# Altium PCB module-BGA_RG-4layers_v2.1.PcbDoc (part 2 of 3)
Units mm, origin at the board's own origin, x right, y up, seen from the top; angles counter-clockwise.
Board outline 20 x 20 mm, 4 copper layers (Top Layer, Signal Layer 1, Signal Layer 2, Bottom Layer), stack 1.546 mm thick; 75 components, 77 nets, 282 pads, 367 vias.
Unrouted connection lines stored in the file: 143.
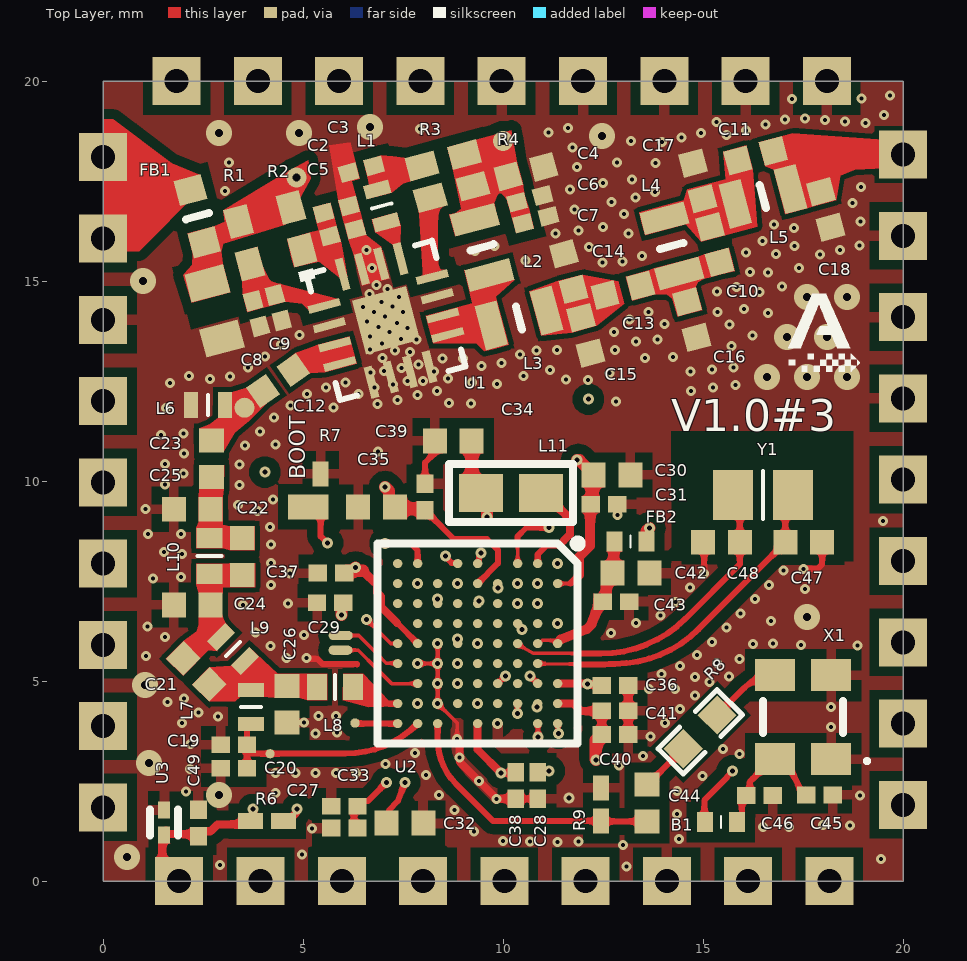
[diagram p0: Top Layer view]

## Part data (continued)
L4 L5: library part LQW18AN10NG80D, "Inductor Wirewound , 10 nH, 52 Milliohm, ± 2%, 4.75 GHz, 1.6 A, 0603 [1608 Metric]", Case Code (Imperial)=0603, Case Code (Metric)=1608, Current Rating=1.6A, DC Resistance (DCR)=52mR, Manufacturer 1=Murata, Max Operating Temperature=125°C, Min Operating Temperature=-55°C, Package Quantity=4000, Self Resonant Frequency=4.75GHz, Supplier Part Number 1=490-17899-1-ND, Test Frequency=100MHz, TOLERANCE=2%, Case/Package=0603, Category 1="Fixed Inductors", ComponentLink1Description=http://www.mouser.com/ds/2/281/murata_inductors-1115352.pdf?src-supplier=Mouser, ComponentLink1URL=http://www.mouser.com/ds/2/281/murata_inductors-1115352.pdf?src-supplier=Mouser, ComponentLink2Description=https://search.murata.co.jp/Ceramy/image/img/P02/JELF243A-0102.pdf?src-supplier=Digi-Key, ComponentLink2URL=https://search.murata.co.jp/Ceramy/image/img/P02/JELF243A-0102.pdf?src-supplier=Digi-Key, ComponentLink3Description=http://www.murata.com/~/media/webrenewal/support/library/catalog/products/inductor/chip/o05e.ashx?src-supplier=Digi-Key, ComponentLink3URL=http://www.murata.com/~/media/webrenewal/support/library/catalog/products/inductor/chip/o05e.ashx?src-supplier=Digi-Key, ComponentLink4Description=https://datasheet.octopart.com/LQW18AN10NG80D-Murata-datasheet-142542380.pdf?src-supplier=Ciiva+Crawler, ComponentLink4URL=https://datasheet.octopart.com/LQW18AN10NG80D-Murata-datasheet-142542380.pdf?src-supplier=Ciiva+Crawler, ComponentLink5Description=https://datasheet.octopart.com/LQW18AN10NG80D-Murata-datasheet-141294525.pdf?src-supplier=Ciiva+Crawler, ComponentLink5URL=https://datasheet.octopart.com/LQW18AN10NG80D-Murata-datasheet-141294525.pdf?src-supplier=Ciiva+Crawler, ComponentLink6Description=https://datasheet.octopart.com/LQW18AN10NG80D-Murata-datasheet-140717668.pdf?src-supplier=Ciiva+Crawler, ComponentLink6URL=https://datasheet.octopart.com/LQW18AN10NG80D-Murata-datasheet-140717668.pdf?src-supplier=Ciiva+Crawler, ComponentLink7Description=https://datasheet.octopart.com/LQW18AN10NG80D-Murata-datasheet-138758702.pdf?src-supplier=Ciiva+Crawler, ComponentLink7URL=https://datasheet.octopart.com/LQW18AN10NG80D-Murata-datasheet-138758702.pdf?src-supplier=Ciiva+Crawler, ComponentLink8Description=https://datasheet.octopart.com/LQW18AN10NG80D-Murata-datasheet-145452284.pdf?src-supplier=Geoflip, ComponentLink8URL=https://datasheet.octopart.com/LQW18AN10NG80D-Murata-datasheet-145452284.pdf?src-supplier=Geoflip, ComponentLink9Description=https://datasheet.octopart.com/LQW18AN10NG80D-Murata-datasheet-142046197.pdf?src-supplier=Arrow.cn, ComponentLink9URL=https://datasheet.octopart.com/LQW18AN10NG80D-Murata-datasheet-142046197.pdf?src-supplier=Arrow.cn, ComponentLink10Description=https://datasheet.octopart.com/LQW18AN10NG80D-Murata-datasheet-141404629.pdf?src-supplier=TME, ComponentLink10URL=https://datasheet.octopart.com/LQW18AN10NG80D-Murata-datasheet-141404629.pdf?src-supplier=TME, Core Material=Ferrite, Description 1="Wirewound Inductor, 10 nH, 52 Milliohm, ± 2%, 4.75 GHz, 1.6 A, 0603 [1608 Metric]", Height=0.9mm, Height - Seated (Max)=0.039inch, Inductance=10nH, Length=0.065inch, Manufacturer Part Number 1=LQW18AN10NG80D, Max DC Current=1.6A, Mount="Surface Mount", Packaging="Tape and Reel", Pricing 1="1=0,21, 10=0,191, 25=0,1696, 50=0,1442, 100=0,1273, 250=0,11664, 500=0,10604, 1000=0,08908 (USD)", Q Factor=38, RoHS Compliant=Yes, Series=LQW18, Shielding=Unshielded, Stock 1=25557, Supplier 1=Digi-Key, Termination=SMD/SMT, Weight=7.1E-05oz, Width=0.99mm
L7: "Inductor RF Chip Multi-Layer 68nH 5% 100MHz 8Q-Factor Air 180mA 1.25Ohm DCR 0402 Paper T/R", Case Code (Imperial)=0402, Case Code (Metric)=1005, Current Rating=180mA, DC Resistance (DCR)=1.25R, Inductance=68nH, Inductance Tolerance=5%, Inductor Type=MONOLITHIC, Manufacturer 1=Murata, Max Operating Temperature=125°C, Min Operating Temperature=-55°C, Package Quantity=1, Self Resonant Frequency=800MHz, Supplier Part Number 1=490-1095-1-ND, Test Frequency=100MHz, Case/Package=0402, Category 1="Fixed Inductors", ComponentLink1Description=https://datasheet.ciiva.com/11801/0900766b80f10808-11801435.pdf?src-supplier=Rs, ComponentLink1URL=https://datasheet.ciiva.com/11801/0900766b80f10808-11801435.pdf?src-supplier=Rs, ComponentLink2Description=https://datasheet.ciiva.com/8002/66026-8002542.pdf?src-supplier=Element14, ComponentLink2URL=https://datasheet.ciiva.com/8002/66026-8002542.pdf?src-supplier=Element14, ComponentLink3Description=https://datasheet.ciiva.com/29696/l0075s0083lqg15hn-29696694.pdf?src-supplier=Digi-Key, ComponentLink3URL=https://datasheet.ciiva.com/29696/l0075s0083lqg15hn-29696694.pdf?src-supplier=Digi-Key, ComponentLink4Description=https://datasheet.ciiva.com/6705/l0075s0083lqg15hn-6705208.pdf?src-supplier=Digi-Key, ComponentLink4URL=https://datasheet.ciiva.com/6705/l0075s0083lqg15hn-6705208.pdf?src-supplier=Digi-Key, ComponentLink5Description=https://datasheet.ciiva.com/29696/l0075s0083lqg15hn-29696695.pdf?src-supplier=Digi-Key, ComponentLink5URL=https://datasheet.ciiva.com/29696/l0075s0083lqg15hn-29696695.pdf?src-supplier=Digi-Key, ComponentLink6Description=https://datasheet.ciiva.com/8510/l0075s0083lqg15hn-8510777.pdf?src-supplier=Avnet, ComponentLink6URL=https://datasheet.ciiva.com/8510/l0075s0083lqg15hn-8510777.pdf?src-supplier=Avnet, Core Material=Air, DC Current=180mA, Depth=0.55mm, Description 1="Inductor RF Chip Multi-Layer 68nH 5% 100MHz 8Q-Factor Air 180mA 1.25Ohm DCR 0402 Paper T/R", Height=0.5mm, Height - Seated (Max)=0.022inch, Lead Free="Lead Free", Length=0.039inch, Manufacturer Part Number 1=LQG15HN68NJ02D, Max DC Current=180mA, Military Standard=Not, Mount="Surface Mount", Number of Pins=2, Packaging="Tape and Reel", Q Factor=8, Reach SVHC Compliant=No, RoHS 1=Yes, RoHS Compliant=Yes, Series=LQG15HS, Shielding=Unshielded, Supplier 1=Digi-Key, Termination=SMD/SMT, TOLERANCE=5%, Width=0.02inch
L8: "Inductor RF Chip Multi-Layer 11nH 5% 0402 Paper T/R", Case Code (Imperial)=0402, Case Code (Metric)=1005, Current Rating=450mA, DC Resistance (DCR)=220mR, Inductance=10nH, Manufacturer 1=Murata, Max Operating Temperature=125°C, Min Operating Temperature=-55°C, Ratings=AEC-Q200, Self Resonant Frequency=3GHz, Supplier Part Number 1=490-15246-1-ND, Test Frequency=100MHz, TOLERANCE=5%, Case/Package=0402, Category 1="Fixed Inductors", ComponentLink1Description=http://search.murata.co.jp/Ceramy/image/img/P02/JELF243B-9117.pdf?src-supplier=Digi-Key, ComponentLink1URL=http://search.murata.co.jp/Ceramy/image/img/P02/JELF243B-9117.pdf?src-supplier=Digi-Key, Core Material=Air, Description 1="Ind Chip Multi-Layer 11nH 5% 0402 Paper T/R", Manufacturer Part Number 1=LQG15WZ11NJ02D, Mount="Surface Mount", Packaging="Cut Tape", RoHS 1=Yes, RoHS Compliant=Yes, Series=LQG15, Shielding=Unshielded, Supplier 1=Digi-Key
L10: "Inductor RF Chip, Aec-Q200, 20Nh, 0402, 2.1Ghz Rohs Compliant: Yes", Case/Package=0402, DC Resistance (DCR)=1.1R, Inductance=20nH, Manufacturer 1=Murata, Max Operating Temperature=125°C, Min Operating Temperature=-55°C, Ratings=AEC-Q200, Self Resonant Frequency=2.1GHz, Supplier Part Number 1=81-LQG15WH20NJ02D, Test Frequency=100MHz, TOLERANCE=5%, Category 1="Fixed Inductors", Description 1="Inductor, Aec-Q200, 20Nh, 0402, 2.1Ghz Rohs Compliant: Yes", Manufacturer Part Number 1=LQG15WH20NJ02D, Mount="Surface Mount", Pricing 1="1=0,14, 10=0,097, 50=0,097, 100=0,078, 1000=0,06, 10000=0,045 (USD)", RoHS 1=Yes, RoHS Compliant=Yes, Series=LQG15, Shielding=Unshielded, Stock 1=9495, Supplier 1=Mouser
L11: "Inductor RF Shielded 15µH, ±5%", Case/Package=0603, DC Resistance (DCR)=1.5R, Inductance=15uH, Manufacturer=TDK, Manufacturer_Part_Number=MLZ2012M150W, Max Operating Temperature=125°C, Min Operating Temperature=-55°C, Saturation Current=70mA, Supplier Part Number 1=810-MLZ1608M150WT000, Test Frequency=2MHz, TOLERANCE=20%, Category 1="Fixed Inductors", Core Material=Ferrite, Description 1="Inductors For Decoupling Circuits, Multilayer Ferrite", Manufacturer 1=TDK, Manufacturer Part Number 1=MLZ1608M150WT000, Mount="Surface Mount", Pricing 1="1=0,15, 10=0,103, 50=0,103, 100=0,084, 1000=0,063, 10000=0,051 (USD)", RoHS 1=Yes, RoHS Compliant=Yes, Series=MLZ, Shielding=Shielded, Stock 1=10538, Supplier 1=Mouser
R1: library part RC0402FR-132K4L, "Thick Film Resistors - SMD 2.4 kOhms 62.5 mW 0402 1%", Case/Package=0402, Manufacturer 1=Yageo, Max Operating Temperature=155°C, Min Operating Temperature=-55°C, Resistance=2.4kR, Supplier Part Number 1=603-RC0402FR-132K4L, Temperature Coefficient=100ppm/°C, TOLERANCE=1%, Category 1="Chip SMD Resistors", ComponentLink1Description=https://datasheet.ciiva.com/8894/pyu-rc0402-51-rohs-l-6-8894383.pdf?src-supplier=Avnet, ComponentLink1URL=https://datasheet.ciiva.com/8894/pyu-rc0402-51-rohs-l-6-8894383.pdf?src-supplier=Avnet, Contact Plating=Tin,Matte, Description 1="Res Thick Film 0402 2.4K Ohm 1% 1/16W ±100ppm/°C Molded SMD SMD Paper T/R", Manufacturer Part Number 1=RC0402FR-132K4L, Pricing 1="1=0,1, 10=0,014, 50=0,014, 100=0,007, 1000=0,004, 10000=0,003 (USD)", RoHS 1=Yes, RoHS Compliant=Yes, Stock 1=107917, Supplier 1=Mouser
R2: library part RN73H1ETTP5421F50, "Thin Film Resistors - SMD 5.42kOhm,0402,1%,50p pm,63mW,50V", Case Code (Imperial)=0402, Case Code (Metric)=1005, Manufacturer 1="KOA Speer", Max Operating Temperature=155°C, Min Operating Temperature=-55°C, Power Rating=63mW, Resistance=5.42kR, Supplier Part Number 1=660-RN73H1ETP5421F50, Temperature Coefficient=50ppm/°C, TOLERANCE=1%, Voltage Rating=50V, Case/Package=0402, Category 1="Chip SMD Resistors", ComponentLink1Description=https://datasheet.ciiva.com/12788/rn73h-12788712.pdf?src-supplier=Mouser, ComponentLink1URL=https://datasheet.ciiva.com/12788/rn73h-12788712.pdf?src-supplier=Mouser, Description 1="Res 5.42K Ohm 1% 1/16W 0402", Height=0.35mm, Length=1mm, Manufacturer Part Number 1=RN73H1ETTP5421F50, Packaging="Tape and Reel", Pricing 1="1=0,26, 10=0,182, 50=0,182, 100=0,127, 1000=0,089, 10000=0,061 (USD)", RoHS 1=Yes, Series=RN73H, Stock 1=7820, Supplier 1=Mouser, Termination=SMD/SMT, Voltage Rating (DC)=50V, Weight=2.3E-05oz, Width=0.5mm
R3 R4: library part CRCW04020000Z0ED, "Resistors Thick Film  - SMD 0402 0.063 W 0 Ohm Jumper", Case Code (Imperial)=0402, Case Code (Metric)=1005, Manufacturer 1=Vishay, Max Operating Temperature=155°C, Max Power Dissipation=63mW, Min Operating Temperature=-55°C, Package Quantity=10000, Ratings=AEC-Q200, Resistance=0mR, Resistor Type="Thick Film", Supplier Part Number 1=541-0.0JCT-ND, Temperature Coefficient=100ppm/°C, TOLERANCE=5%, Voltage Rating=50V, Case/Package=0402, Category 1="Chip SMD Resistors", ComponentLink1Description=https://datasheet.ciiva.com/3255/dcrcwe3-3255944.pdf?src-supplier=Avnet, ComponentLink1URL=https://datasheet.ciiva.com/3255/dcrcwe3-3255944.pdf?src-supplier=Avnet, ComponentLink2Description=https://datasheet.ciiva.com/3255/dcrcwe3-3255945.pdf?src-supplier=Avnet, ComponentLink2URL=https://datasheet.ciiva.com/3255/dcrcwe3-3255945.pdf?src-supplier=Avnet, ComponentLink3Description=https://datasheet.ciiva.com/2461/dcrcwe3-2461962.pdf?src-supplier=Digi-Key, ComponentLink3URL=https://datasheet.ciiva.com/2461/dcrcwe3-2461962.pdf?src-supplier=Digi-Key, ComponentLink4Description=https://datasheet.ciiva.com/7841/1720486-7841802.pdf?src-supplier=Element14, ComponentLink4URL=https://datasheet.ciiva.com/7841/1720486-7841802.pdf?src-supplier=Element14, ComponentLink5Description=https://datasheet.ciiva.com/2461/dcrcwe3-2461964.pdf?src-supplier=Digi-Key, ComponentLink5URL=https://datasheet.ciiva.com/2461/dcrcwe3-2461964.pdf?src-supplier=Digi-Key, ComponentLink6Description=https://datasheet.ciiva.com/7841/1697337-7841468.pdf?src-supplier=Element14, ComponentLink6URL=https://datasheet.ciiva.com/7841/1697337-7841468.pdf?src-supplier=Element14, ComponentLink7Description=https://datasheet.ciiva.com/16761/70200976-16761309.pdf?src-supplier=Allied+Electronics, ComponentLink7URL=https://datasheet.ciiva.com/16761/70200976-16761309.pdf?src-supplier=Allied+Electronics, ComponentLink8Description=https://datasheet.ciiva.com/26311/fld-crcw-e3-data-en-26311550.pdf?src-supplier=Distrelec, ComponentLink8URL=https://datasheet.ciiva.com/26311/fld-crcw-e3-data-en-26311550.pdf?src-supplier=Distrelec, Construction=Rectangular, Contact Plating=Tin, Depth=0.5mm, Description 1="CRCW Series 0402 0.063 W 0 Ohm Jumper Surface Mount Thick Film Chip Resistor", Features="Automotive AEC-Q200", Height=0.35mm, Lead Free="Lead Free", Length=1mm, Manufacturer Part Number 1=CRCW04020000Z0ED, Military Standard=Not, Number of Terminations=2, Packaging="Tape and Reel", Power Rating=63mW, Pricing 1="1=0,1, 10=0,029, 25=0,0208, 50=0,016, 100=0,0118, 250=0,009, 500=0,0072, 1000=0,0053, 5000=0,0038 (USD)", Radiation Hardening=No, Reach SVHC Compliant=Unknown, RoHS 1=Yes, RoHS Compliant=Yes, Series=CRCW, Size Code=0402, Stock 1=170588, Supplier 1=Digi-Key, Termination=SMD/SMT, Voltage Rating (DC)=50V, Weight=2.3E-05oz, Width=0.5mm
R6 R7: library part CRCW0201100KFNED, "Resistors Thick Film  - SMD 1/20watt 100Kohms 1% 200ppm", Manufacturer_Name=Vishay, Mouser Part Number=71-CRCW0201100KFNED, Arrow Part Number=CRCW0201100KFNED, Arrow Price/Stock=https://www.arrow.com/en/products/crcw0201100kfned/vishay?region=nac, Datasheet Link=http://www.vishay.com/docs/20035/dcrcwe3.pdf, Height=0.28mm, Manufacturer_Part_Number=CRCW0201100KFNED, Mouser Price/Stock=https://www.mouser.co.uk/ProductDetail/Vishay-Dale/CRCW0201100KFNED?qs=IQLUlsvFoXuZOEgCEo70BA%3D%3D
R8: library part HP02WAF2200TCE, "Resistors Thick Film - SMD HP02 (0402) 1/10W 1% 220R T/R-10000", Manufacturer="Royal Electronic Factory", Supplier Part Number 1=303-HP02WAF2200TCE, Manufacturer Part Number=HP02WAF2200TCE, Pricing 1="10000=0,018 (USD)", RoHS=No, Supplier 1=Mouser
R9: library part AF0201FR-0710KL, "Resistor Thick Film Anti-Sulfurated Chip 0201 10kOhm 1% Paper T/R", Case/Package=0201, Manufacturer=Yageo, Max Operating Temperature=125°C, Max Power Dissipation=50mW, Min Operating Temperature=-55°C, Resistance=10kR, Supplier Part Number 1=603-AF0201FR-0710KL, Temperature Coefficient=200ppm/°C, TOLERANCE=1%, Category="Chip SMD Resistors", Category 1="Chip SMD Resistors", ComponentLink1Description=https://www.yageo.com/upload/media/product/productsearch/datasheet/rchip/PYu-AF_51_RoHS_L_6.pdf?src-supplier=Digi-Key, ComponentLink1URL=https://www.yageo.com/upload/media/product/productsearch/datasheet/rchip/PYu-AF_51_RoHS_L_6.pdf?src-supplier=Digi-Key, ComponentLink2Description=Mouser, ComponentLink2URL=https://www.mouser.fr/ProductDetail/YAGEO/AF0201FR-0710KL?qs=tggtontpCXMMc5XUOoECzA%3D%3D, Description 1="Anti-Sulfurated Chip Resistor Thick Film 0201 10kOhm 1% Paper T/R", Features="Moisture Resistant,Anti-Sulfur", Manufacturer 1=Yageo, Manufacturer Part Number=AF0201FR-0710KL, Manufacturer Part Number 1=AF0201FR-0710KL, Number of Terminations=2, Packaging="Tape and Reel", Pricing 1="1=0,15, 10=0,057, 50=0,057, 100=0,031, 1000=0,019, 10000=0,011 (USD)", RoHS=Yes, RoHS 1=Yes, RoHS Compliant=Yes, Series=AF, Stock 1=42720, Supplier 1=Mouser
U1: "RF Amplifier High Efficiency, 3.5Watt PA/Saturated PA, OP1dB >34.0 dBm; 0.4 - 0.5 GHz", Manufacturer 1="Guerrilla RF", Supplier Part Number 1=459-GRF5504, Description 1="Rf & Mw Power Amplifier", Manufacturer Part Number 1=GRF5504, Mfr_Name="Guerrilla RF", Pricing 1="1=4,41, 10=3,96, 50=3,74, 100=3,25, 1000=2,35, 10000=2,27 (USD)", RefDes=RefDes, RoHS 1=No, Stock 1=2152, Supplier 1=Mouser, type=Type
U2: "Multiprotocol Wireless 32-bit MCUwith LPWAN Sub-GHz radio solution(BGA)", Manufacturer=STMICROELECTRONICS, Manufacturer 1=STMicroelectronics, Manufacturer Part Number 1=STM32WL55JCI7, Manufacturer_Part_Number=STM32WL55JCU6, Supplier Part Number 1=511-STM32WL55JCI7, Category 1=Microcontrollers, Description 1="16/32-BITS Micros", Pricing 1="1=11,79, 10=10,83, 50=10,38, 100=9,15, 1000=7,4, 10000=7,4 (USD)", RoHS 1=Yes, Stock 1=3639, Supplier 1=Mouser
U3: "ESD protection 6V1 - Varistors MLV 0603 18V 3pF", Manufacturer=STMICROELECTRONICS, Manufacturer_Part_Number=ESDALC6V1-1U2, Supplier Part Number 1=511-ESDALC6V1-1U2, Supplier 1=Mouser
X1: "TCXO Oscillators TG2520SMN 32.0000M-MCGNNM0: TCXO 2.8V 3.3V 0.5PPM -40 85C NON O/E 1K TR", Manufacturer 1=Epson, Manufacturer Part Number 1=TG2520SMN32.0000M-MCGNNM0, Manufacturer_Name="Epson Timing", Manufacturer_Part_Number="TG2520SMN 32.0000M-MCGNNM0", Mouser Part Number=732-2520SMN32MCGNNM0, Category 1=Uncategorized, Datasheet Link=https://support.epson.biz/td/api/doc_check.php?dl=brief_TG2520SMN&lang=en, Geometry.Height=0.8mm, Mouser Price/Stock=https://www.mouser.co.uk/ProductDetail/Epson-Timing/TG2520SMN-32.0000M-MCGNNM0?qs=4qgZ1GHix0UhyPXaSR8nfw%3D%3D, Pricing 1="1=1,72, 10=1,65, 50=1,65, 100=1,38, 1000=1,12, 10000=1,05 (USD)", RoHS 1=No, Stock 1=1915, Supplier 1=Mouser, Supplier Part Number 1=732-2520SMN32MCGNNM0
Y1: "Crystals 32.768KHZ 12.5PF SMD", Case/Package=SMD/SMT, ESR (Equivalent Series Resistance)=80kR, Frequency=32.768kHz, Frequency Tolerance=20ppm, Load Capacitance=12.5pF, Manufacturer 1=NDK, Max Operating Temperature=85°C, Min Operating Temperature=-40°C, Mouser Part Number=344-NX2012SA32768K1, Category 1=Crystals, ComponentLink1Description=http://www.ndk.com/images/products/catalog/c_NX2012SA-STD-MUB-1_e.pdf?src-supplier=Digi-Key, ComponentLink1URL=http://www.ndk.com/images/products/catalog/c_NX2012SA-STD-MUB-1_e.pdf?src-supplier=Digi-Key, Datasheet Link=https://www.mouser.de/datasheet/2/905/c_NX2012SA-STD-MUB-1_e-1317508.pdf, Description 1="Crystal 32.7680KHZ 12.5PF SMD", Height=0.6mm, Length=0.081inch, Manufacturer Part Number 1=NX2012SA-32.768K-STD-MUB-1, Manufacturer_Name=NDK, Manufacturer_Part_Number=NX2012SA-32.768K-STD-MUB-1, Mount="Surface Mount", Mouser Price/Stock=https://www.mouser.co.uk/ProductDetail/NDK/NX2012SA-32.768K-STD-MUB-1?qs=55YtniHzbhA%252B6%2Fl1MwFZaQ%3D%3D, Packaging="Cut Tape", Pricing 1="1=0,77, 10=0,638, 50=0,638, 100=0,536, 1000=0,426, 10000=0,377 (USD)", RoHS 1=Yes, RoHS Compliant=Yes, Series=NX2012SA, Stock 1=65335, Supplier 1=Mouser, Supplier Part Number 1=344-NX2012SA32768K1, Width=0.047inch

## Free pads (board coordinates)
  rect 1.2x1.2 hole 0.6: 1(0,1.839) 1(1.839,20) 1(18.161,0) 1(20,18.161) 2(0,3.871) 2(3.871,20) 2(16.129,0) 2(20,16.129) 3(0,5.903) 3(5.903,20) 3(14.097,0) 3(20,14.097) 4(0,7.935) 4(7.935,20) 4(12.065,0) 4(20,12.065) 5(0,9.967) 5(9.967,20) 5(10.033,0) 5(20,10.033) 6(0,11.999) 6(8.001,0) 6(11.999,20) 6(20,8.001) 7(0,14.031) 7(5.969,0) 7(14.031,20) 7(20,5.969) 8(0,16.063) 8(3.937,0) 8(16.063,20) 8(20,3.937) 9(0,18.095) 9(1.905,0) 9(18.095,20) 9(20,1.905)
  rect 0.725x1 smd rot 105: 1(2.975,13.566) 2(2.606,14.942)
  round 0.5 smd mask+0.02: 10(3.536,11.833)
  round 0.232 smd mask+0.02: 10(4.176,3.182) 10(6.3,3.95)
  oval 0.6x0.232 smd mask+0.02: 10(5.935,5.772) 10(5.942,6.138)
  rect 0.625x0.625 smd: 11(4.941,9.353)

## Via types
v1: diameter 0.25, hole 0.1, Top Layer to Signal Layer 1, 183 vias
v2: diameter 0.25, hole 0.1, Top Layer to Signal Layer 2, 62 vias
v3: diameter 0.25, hole 0.1, Top Layer to Bottom Layer, 36 vias
v4: diameter 0.275, hole 0.125, Top Layer to Signal Layer 2, 22 vias
v5: diameter 0.275, hole 0.125, Top Layer to Signal Layer 1, 20 vias
v6: diameter 0.65, hole 0.2, Top Layer to Bottom Layer, tented both sides, 17 vias
v7: diameter 0.25, hole 0.1, Signal Layer 1 to Signal Layer 2, 11 vias
v8: diameter 0.275/0/0.275 (per signal layer), hole 0.125, Top Layer to Signal Layer 2, 10 vias
v9: diameter 0.275, hole 0.125, Top Layer to Bottom Layer, 2 vias
v10: diameter 0.25/0/0.25 (per signal layer), hole 0.1, Top Layer to Signal Layer 2, 2 vias
v11: diameter 0.5, hole 0.2, Top Layer to Signal Layer 1, 2 vias

## Nets (pads, with @x,y where several pads share a name; then routed paths per layer and width w, separated by ;. In a path a pad name is that pad's centre, name@x,y a point inside that pad or via, vN(x,y) a via of type N, cw(c..) or ccw(c..) an arc to the next point about the centre after c; other vN are vias at no path point)
ANT_ARGOS_2: C11.2 C18.2 L5.2 pad.1@20,18.161